# Altium PCB Copy of TQ210_BOARD_V4-20121031.PcbDoc (part 6 of 8)
Units mm, origin at the board's own origin, x right, y up, seen from the top; angles counter-clockwise.
Board outline 191.2 x 131.27 mm, 2 copper layers (TopLayer, BottomLayer); 362 components, 455 nets, 1594 pads, 630 vias.
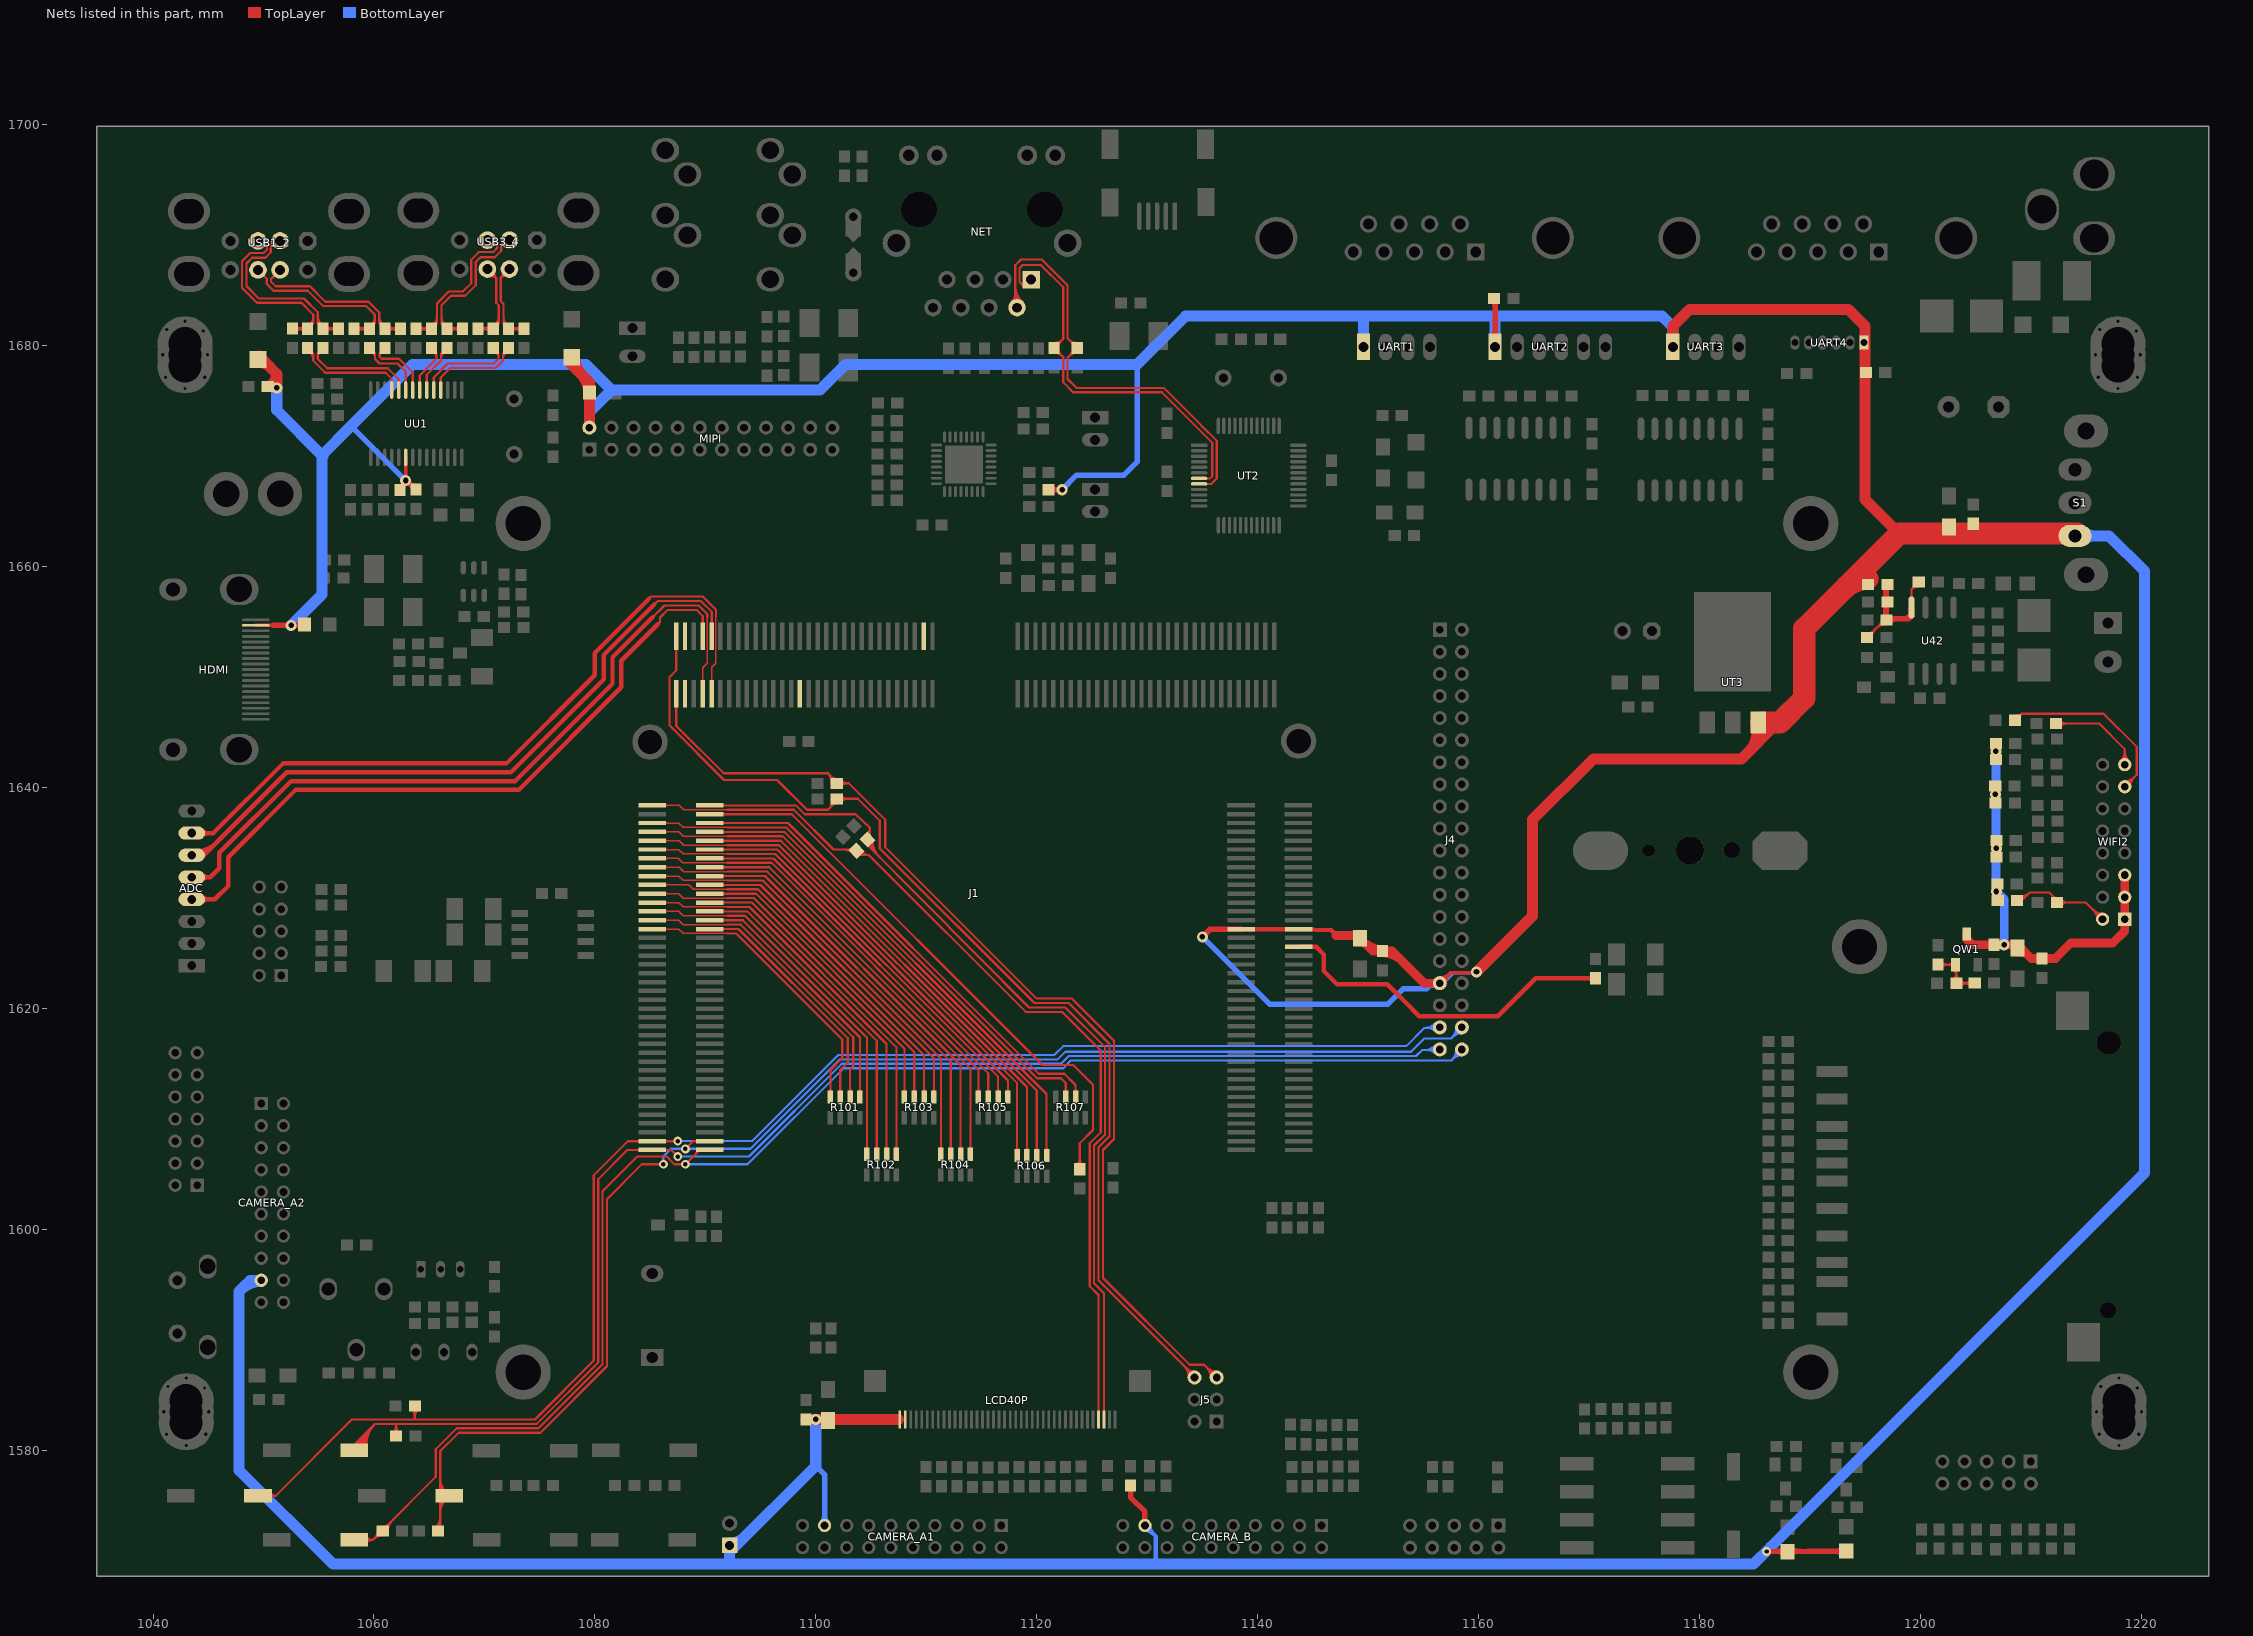
[diagram p6: the nets of this part, all layers, seen from the top]

## Via types
v1: diameter 1, hole 0.5, TopLayer to BottomLayer, 458 vias
v2: diameter 0.8, hole 0.4, TopLayer to BottomLayer, 172 vias

## Nets (pads, with @x,y where several pads share a name; then routed paths per layer and width w, separated by ;. In a path a pad name is that pad's centre, name@x,y a point inside that pad or via, vN(x,y) a via of type N, cw(c..) or ccw(c..) an arc to the next point about the centre after c; other vN are vias at no path point) (continued)
SD3_WPN: RW8.2 RW16.2 WIFI2.2 | length 17.4
  TopLayer w0.2: RW8.2@1208.765,1629.774 1209.174,1629.774 1209.9,1630.5 ; RW8.2@1208.815,1629.774 ccw(c1208.912,1630.38) 1209.346,1629.946 ; RW8.2@1208.846,1629.971 ccw(c1208.988,1630.858) 1209.623,1630.223 ; RW8.2@1208.878,1630.169 ccw(c1209.065,1631.335) 1209.9,1630.5 ; 1211.866,1630.339 cw(c1211.236,1629.71) RW16.2@1212.122,1629.624 ; RW16.2@1212.114,1630.091 ccw(c1212.321,1630.298) RW16.2@1212.321,1630.005 ; RW16.2@1212.371,1629.605 1214.995,1629.605 WIFI2.2@1216.512,1628.088 ; RW16.2@1212.6,1629.605 1211.705,1630.5 1209.9,1630.5 ; RW16.2@1212.704,1629.322 cw(c1213.387,1628.639) 1213.387,1629.605 cw(c1213.387,1630.571) RW16.2@1212.704,1629.888 ; WIFI2.2@1216.012,1628.088 ccw(c1214.805,1628.088) 1215.658,1628.942 ccw(c1216.512,1629.795) WIFI2.2@1216.512,1628.588 ; WIFI2.2@1216.212,1628.088 ccw(c1215.487,1628.088) 1215.999,1628.6 ccw(c1216.512,1629.112) WIFI2.2@1216.512,1628.388
SYS_OE: J1.84
TSXM0: ADC.6 J1.89 | length 63.1
  TopLayer w0.2: 1085.4,1656.6 1085.7,1656.9 1089.595,1656.9 1090.575,1655.92 J1.89@1090.575,1653.687
  TopLayer w0.4: ADC.6@1043.502,1633.888 1044.588,1633.888 1052.1,1641.4 1072.4,1641.4 1080.804,1649.804 1080.804,1652.004 1085.4,1656.6 ; ADC.6@1044.102,1633.888 ccw(c1044.102,1635.061) 1044.931,1634.231 ; ADC.6@1044.102,1634.288 ccw(c1044.102,1636.427) 1045.614,1634.914
TSXM1: CL1.1 J1.79 LCD40P.37 | length 89.3
  TopLayer w0.135: J1.79@1085.2,1638.4 1087.658,1638.4 1088.058,1638 1092,1638 ; J1.79@1086.344,1638.306 cw(c1086.57,1638.08) 1086.57,1638.4 cw(c1086.57,1638.72) J1.79@1086.344,1638.494
  TopLayer w0.2: 1092,1638 1098,1638 1101.603,1634.397 1103.603,1634.397 1104.1,1633.9 1104.8,1633.9 ; 1102.536,1634.397 cw(c1102.536,1633.21) CL1.1@1103.375,1634.049 ; 1102.848,1634.397 ccw(c1102.848,1635.142) CL1.1@1103.375,1634.615 ; CL1.1@1103.019,1634.397 cw(c1103.019,1633.693) CL1.1@1103.516,1634.191 ; CL1.1@1103.728,1634.261 ccw(c1104.237,1634.439) 1104.237,1633.9 ; CL1.1@1103.917,1634.327 ccw(c1104.518,1634.537) 1104.518,1633.9 ; CL1.1@1103.931,1633.917 cw(c1104.004,1633.794) 1104.105,1633.895 cw(c1104.21,1634) CL1.1@1104.08,1634.071 ; CL1.1@1104.106,1634.393 ccw(c1104.8,1634.635) 1104.8,1633.9 ; LCD40P.37@1125.6,1582.8 1125.6,1594.064 1124.8,1594.864 1124.8,1607.8 1125.8,1608.8 1125.8,1616.2 1122.3,1619.7 1119,1619.7 1104.8,1633.9
TSXP0: ADC.7 J1.90 | length 67.3
  TopLayer w0.135: J1.90@1090.565,1648.497 1090.565,1650.889 1090.965,1651.289 1090.965,1655.486
  TopLayer w0.2: 1084.9,1657.1 1085.1,1657.3 1089.795,1657.3 1090.955,1656.139 1090.955,1655.496
  TopLayer w0.4: ADC.7@1043.502,1635.888 1045.456,1635.888 1051.769,1642.2 1072,1642.2 1079.986,1650.186 1079.986,1652.186 1084.9,1657.1 ; ADC.7@1044.385,1635.605 cw(c1045.067,1634.922) 1045.067,1635.888 cw(c1045.067,1636.853) ADC.7@1044.385,1636.171
TSXP1: CL2.1 J1.80 LCD40P.38 | length 86.4
  TopLayer w0.2: J1.80@1090.409,1638.385 1090.424,1638.4 1098.2,1638.4 1099,1637.6 1103.6,1637.6 1104.9,1636.4 ; CL2.1@1104.47,1635.686 ccw(c1104.091,1636.4) 1104.9,1636.4 ; CL2.1@1104.564,1635.509 ccw(c1104.268,1636.068) 1104.9,1636.068 ; CL2.1@1104.658,1634.868 cw(c1104.606,1634.578) 1104.9,1634.578 ; CL2.1@1104.728,1635.261 ccw(c1105.903,1635.257) 1105.069,1634.429 ; 1104.9,1634.711 cw(c1105.279,1634.711) CL2.1@1105.011,1634.979 ; CL2.1@1104.928,1635.261 ccw(c1106.586,1635.255) 1105.41,1634.087 ; CL2.1@1105.128,1635.26 ccw(c1107.269,1635.253) 1105.75,1633.744 ; LCD40P.38@1126.1,1583 1126.1,1594.232 1125.2,1595.132 1125.2,1607.6 1126.2,1608.6 1126.2,1616.5 1122.6,1620.1 1119.3,1620.1 1104.9,1634.6 1104.9,1636.4
TSYM0: ADC.4 J1.87 | length 63.9
  TopLayer w0.2: 1085.7,1654.8 1085.9,1655 1085.9,1655.4 1086.6,1656.1 1089.195,1656.1 1089.775,1655.52 J1.87@1089.775,1653.687
  TopLayer w0.4: ADC.4@1043.502,1629.888 1045.588,1629.888 1046.8,1631.1 1046.8,1633.7 1052.9,1639.8 1073.1,1639.8 1082.4,1649.1 1082.4,1651.5 1085.7,1654.8 ; ADC.4@1044.385,1629.605 cw(c1045.067,1628.922) 1045.067,1629.888 cw(c1045.067,1630.853) ADC.4@1044.385,1630.171
TSYM1: CL3.1 J1.81 J5.6 | length 107.3
  TopLayer w0.2: J1.81@1087.294,1652.576 cw(c1087.098,1652.38) 1087.375,1652.38 ; 1087.375,1652.431 cw(c1087.581,1652.431) J1.81@1087.435,1652.576 ; J1.81@1087.375,1653.687 1087.375,1650.625 1086.75,1650 1086.75,1645.65 1091.7,1640.7 1096.5,1640.7 1099.2,1638 1101.1,1638 1102.1,1639 1103.8,1639 1105.8,1637 1105.8,1634.5 1119.8,1620.5 1122.9,1620.5 1126.6,1616.8 1126.6,1608.434 1125.6,1607.434 1125.6,1595.4 1134.3,1586.7 J5.6@1134.3,1586.6 ; 1101.223,1638.123 ccw(c1100.615,1638.731) CL3.1@1101.456,1638.91 ; 1101.483,1638.383 ccw(c1101.044,1638.822) CL3.1@1101.652,1638.951 ; 1101.583,1638.483 cw(c1101.847,1638.219) CL3.1@1101.847,1638.593 ; CL3.1@1102.089,1638.851 cw(c1102.448,1638.492) 1102.448,1639 ; CL3.1@1102.23,1638.71 cw(c1102.931,1638.009) 1102.931,1639 ; CL3.1@1102.23,1639.275 ccw(c1102.895,1639.94) 1102.895,1639 ; 1133.316,1587.684 cw(c1132.232,1586.6) 1133.765,1586.6 ccw(c1132.232,1586.6) 1133.316,1587.684 ; 1133.557,1587.443 ccw(c1134.3,1588.185) 1134.3,1587.135 cw(c1134.3,1588.185) 1133.557,1587.443 ; 1133.657,1587.343 cw(c1132.915,1586.6) 1133.965,1586.6 ccw(c1132.915,1586.6) 1133.657,1587.343 ; 1133.899,1587.101 ccw(c1134.3,1587.502) 1134.3,1586.935 cw(c1134.3,1587.502) 1133.899,1587.101
TSYP0: ADC.5 J1.88 | length 68.8
  TopLayer w0.135: J1.88@1089.671,1649.641 ccw(c1089.445,1649.867) 1089.765,1649.867 ccw(c1090.084,1649.867) J1.88@1089.858,1649.641 ; J1.88@1089.765,1648.497 1089.765,1650.876 1090.164,1651.276 1090.164,1655.391
  TopLayer w0.2: 1085.253,1655.453 1086.3,1656.5 1089.395,1656.5 1090.172,1655.722 1090.172,1655.399
  TopLayer w0.4: ADC.5@1043.502,1631.888 1045.188,1631.888 1046,1632.7 1046,1634.1 1052.5,1640.6 1072.8,1640.6 1081.6,1649.4 1081.6,1651.8 1085.253,1655.453 ; ADC.5@1044.385,1631.605 cw(c1045.067,1630.922) 1045.067,1631.888 cw(c1045.067,1632.853) ADC.5@1044.385,1632.171
TSYP1: CL4.1 J1.82 J5.5 | length 102.8
  TopLayer w0.2: J1.82@1087.294,1647.376 cw(c1087.098,1647.181) 1087.375,1647.181 ; 1087.375,1647.231 cw(c1087.581,1647.231) J1.82@1087.435,1647.376 ; J1.82@1087.375,1648.487 1087.375,1645.591 1091.666,1641.3 1101.1,1641.3 1102,1640.4 1103,1640.4 1106.3,1637.1 1106.3,1634.6 1120,1620.9 1123.2,1620.9 1127,1617.1 1127,1608.2 1126,1607.2 1126,1595.6 1133.852,1587.748 1135.152,1587.748 J5.5@1136.3,1586.6 ; 1101.051,1641.349 cw(c1100.095,1640.393) CL4.1@1101.447,1640.393 ; 1101.393,1641.007 cw(c1100.778,1640.393) CL4.1@1101.647,1640.393 ; 1101.438,1640.962 ccw(c1101.847,1641.372) CL4.1@1101.847,1640.793 ; CL4.1@1102.089,1640.251 cw(c1102.448,1639.892) 1102.448,1640.4 ; CL4.1@1102.23,1640.11 cw(c1102.931,1639.409) 1102.931,1640.4 ; CL4.1@1102.23,1640.675 ccw(c1102.895,1641.34) 1102.895,1640.4 ; 1135.387,1587.513 cw(c1134.473,1586.6) 1135.765,1586.6 ccw(c1134.473,1586.6) 1135.387,1587.513 ; 1135.387,1587.513 ccw(c1136.3,1588.427) 1136.3,1587.135 cw(c1136.3,1588.427) 1135.387,1587.513 ; 1135.728,1587.172 cw(c1135.156,1586.6) 1135.965,1586.6 ccw(c1135.156,1586.6) 1135.728,1587.172 ; 1135.728,1587.172 ccw(c1136.3,1587.744) 1136.3,1586.935 cw(c1136.3,1587.744) 1135.728,1587.172
TX+: NET.1 R206.1 UT2.7 | length 40.3
  TopLayer w0.2: NET.1@1119.073,1685.468 1118.768,1685.468 1118.457,1685.779 1118.457,1687.062 1118.718,1687.322 1120.378,1687.322 1122.4,1685.3 1122.4,1680.638 R206.1@1121.577,1679.815 1122.4,1678.992 1122.4,1676.7 1123.3,1675.8 1131.334,1675.8 1135.9,1671.234 1135.9,1668.2 1135.704,1668.004 UT2.7@1134.703,1668.004 ; R206.1@1121.577,1679.365 cw(c1121.577,1678.279) 1122.345,1679.047 ; R206.1@1121.577,1679.565 cw(c1121.577,1678.961) R206.1@1122.004,1679.388 ; R206.1@1121.577,1680.065 ccw(c1121.577,1680.669) R206.1@1122.004,1680.242 ; R206.1@1121.577,1680.265 ccw(c1121.577,1681.351) 1122.345,1680.583 ; R206.1@1121.977,1679.765 ccw(c1122.822,1679.765) 1122.225,1679.168 ; R206.1@1121.977,1679.865 cw(c1122.822,1679.865) 1122.225,1680.462
TX-: NET.2 R207.1 UT2.8 | length 51
  TopLayer w0.2: NET.2@1117.744,1683.946 ccw(c1116.988,1684.702) 1118.057,1684.702 ; 1118.057,1684.571 ccw(c1119.341,1684.571) NET.2@1118.433,1683.663 ; 1118.057,1685.054 ccw(c1119.824,1685.054) NET.2@1118.575,1683.805 ; 1118.057,1685.537 ccw(c1120.307,1685.537) NET.2@1118.716,1683.946 ; NET.2@1118.23,1683.46 1118.057,1683.633 1118.057,1687.297 1118.591,1687.83 1120.47,1687.83 1122.8,1685.5 1122.8,1680.692 R207.1@1123.677,1679.815 1122.8,1678.938 1122.8,1677 1123.6,1676.2 1131.5,1676.2 1136.3,1671.4 ; 1122.909,1679.047 cw(c1123.677,1678.279) R207.1@1123.677,1679.365 ; 1122.909,1680.583 ccw(c1123.677,1681.351) R207.1@1123.677,1680.265 ; 1123.03,1679.168 ccw(c1122.432,1679.765) R207.1@1123.277,1679.765 ; 1123.03,1680.462 cw(c1122.432,1679.865) R207.1@1123.277,1679.865 ; R207.1@1123.25,1679.388 cw(c1123.677,1678.961) R207.1@1123.677,1679.565 ; R207.1@1123.25,1680.242 ccw(c1123.677,1680.669) R207.1@1123.677,1680.065 ; UT2.8@1134.703,1667.504 1135.804,1667.504 1136.3,1668 1136.3,1671.4 ; 1134.9,1672.8 1136.3,1671.4
USB1-DM: RU1.1 UU1.10 | length 12
  TopLayer w0.2: 1054.9,1678.902 1054.913,1678.915 ; 1054.913,1678.937 cw(c1055.538,1678.937) RU1.1@1055.433,1679.553 ; 1054.913,1679.173 cw(c1055.498,1679.173) RU1.1@1055.4,1679.75 ; RU1.1@1055.4,1679.8 1054.913,1679.313 1054.913,1678.82 1055.764,1677.968 1061.244,1677.968 1062.235,1676.977 UU1.10@1062.235,1676
USB1-DP: RU2.1 UU1.11 | length 12
  TopLayer w0.2: RU2.1@1053.945,1679.558 cw(c1053.735,1678.822) 1054.5,1678.822 ; RU2.1@1054,1679.75 cw(c1053.811,1679.087) 1054.5,1679.087 ; RU2.1@1054,1679.8 1054.5,1679.3 1054.5,1678.667 1055.599,1677.568 1061.06,1677.568 1061.6,1677.028 UU1.11@1061.6,1676
USB1_D+: RU2.2 RU4.2 USB1_2.3 | length 23
  TopLayer w0.2: USB1_2.3@1049.5,1689.5 1049.906,1689.5 1050.305,1689.102 1050.305,1688.695 1050.025,1688.416 1048.806,1688.416 1048.044,1687.654 1048.044,1685.266 1049.41,1683.9 1053.433,1683.9 1054.506,1682.826 1054.506,1682.056 ; RU4.2@1052.62,1681.565 1052.635,1681.55 RU2.2@1054,1681.55 1054.506,1682.056 ; RU4.2@1052.761,1681.707 ccw(c1053.14,1682.085) 1053.14,1681.55 ; RU4.2@1052.903,1681.283 cw(c1053.548,1680.637) RU2.2@1053.548,1681.55 ; RU4.2@1052.903,1681.848 ccw(c1053.623,1682.568) RU2.2@1053.623,1681.55 ; RU2.2@1053.717,1681.267 ccw(c1053.034,1680.584) 1053.034,1681.55 ccw(c1053.034,1682.516) RU2.2@1053.717,1681.833 ; RU2.2@1053.941,1681.791 ccw(c1053.707,1682.556) 1054.506,1682.556 ; RU2.2@1054,1681.6 ccw(c1053.79,1682.285) 1054.506,1682.285 ; RU2.2@1054.138,1681.975 ccw(c1054.259,1682.304) 1054.506,1682.056 ; RU2.2@1054.392,1681.679 cw(c1054.802,1681.761) 1054.506,1682.056
USB1_D-: RU1.2 RU3.2 USB1_2.2 | length 22
  TopLayer w0.2: USB1_2.2@1051.5,1689.5 1051.033,1689.5 1050.66,1689.127 1050.66,1688.467 1050.178,1687.984 1048.984,1687.984 1048.45,1687.451 1048.45,1685.425 1049.576,1684.3 1053.668,1684.3 1054.913,1683.055 1054.913,1682.037 RU1.2@1055.4,1681.55 RU3.2@1056.8,1681.55 ; 1054.913,1682.399 ccw(c1055.811,1682.399) RU1.2@1055.4,1681.6 ; 1054.913,1682.727 ccw(c1055.98,1682.727) RU1.2@1055.492,1681.778 ; RU1.2@1055.683,1681.267 cw(c1056.366,1680.584) 1056.366,1681.55 cw(c1056.366,1682.516) RU1.2@1055.683,1681.833 ; RU3.2@1056.517,1681.267 ccw(c1055.834,1680.584) 1055.834,1681.55 ccw(c1055.834,1682.516) RU3.2@1056.517,1681.833
USB2-DM: RU5.1 UU1.8 | length 6.1
  TopLayer w0.2: RU5.1@1061,1679.8 1060.526,1679.326 1060.526,1679.016 1060.704,1678.838 1062.27,1678.838 1063.505,1677.603 UU1.8@1063.505,1676
USB2-DP: RU6.1 UU1.9 | length 7.8
  TopLayer w0.2: RU6.1@1059.566,1679.553 cw(c1059.46,1678.927) 1060.094,1678.927 ; RU6.1@1059.6,1679.75 cw(c1059.5,1679.164) 1060.094,1679.164 ; RU6.1@1059.6,1679.8 1060.094,1679.306 1060.094,1678.813 1060.501,1678.407 1062.136,1678.407 1062.87,1677.673 UU1.9@1062.87,1676
USB2_D+: RU6.2 RU8.2 USB1_2.7 | length 20.3
  TopLayer w0.2: USB1_2.7@1049.5,1686.88 1050.3,1686.08 1050.3,1685.6 1050.9,1685 1054,1685 1055.4,1683.6 1059.321,1683.6 1060.069,1682.852 1060.069,1682.019 RU6.2@1059.6,1681.55 RU8.2@1058.2,1681.55 ; RU8.2@1058.483,1681.267 cw(c1059.166,1680.584) 1059.166,1681.55 cw(c1059.166,1682.516) RU8.2@1058.483,1681.833 ; RU6.2@1059.317,1681.267 ccw(c1058.634,1680.584) 1058.634,1681.55 ccw(c1058.634,1682.516) RU6.2@1059.317,1681.833 ; RU6.2@1059.53,1681.787 ccw(c1059.241,1682.564) 1060.069,1682.564 ; RU6.2@1059.6,1681.6 ccw(c1059.348,1682.275) 1060.069,1682.275
USB2_D-: RU5.2 RU7.2 USB1_2.6 | length 21.5
  TopLayer w0.2: USB1_2.6@1051.5,1686.88 1050.686,1686.066 1050.686,1685.814 1051.1,1685.4 1054.2,1685.4 1055.6,1684 1059.505,1684 1060.475,1683.029 1060.475,1682.075 RU5.2@1061,1681.55 RU7.2@1062.4,1681.55 ; 1060.475,1682.411 ccw(c1061.365,1682.411) RU5.2@1061,1681.6 ; 1060.475,1682.72 ccw(c1061.504,1682.72) RU5.2@1061.082,1681.782 ; RU5.2@1060.609,1681.683 ccw(c1060.218,1681.767) 1060.5,1682.05 ccw(c1060.737,1682.286) RU5.2@1060.857,1681.974 ; RU5.2@1061.283,1681.267 cw(c1061.966,1680.584) 1061.966,1681.55 cw(c1061.966,1682.516) RU5.2@1061.283,1681.833 ; RU7.2@1062.117,1681.267 ccw(c1061.434,1680.584) 1061.434,1681.55 ccw(c1061.434,1682.516) RU7.2@1062.117,1681.833
USB3-DM: RU9.1 UU1.6 | length 6.5
  TopLayer w0.2: UU1.6@1064.775,1676 1064.775,1677.381 1066.063,1678.669 1066.063,1679.263 RU9.1@1066.6,1679.8 ; 1066.063,1678.801 cw(c1066.843,1678.801) RU9.1@1066.65,1679.556 ; 1066.063,1679.059 cw(c1066.777,1679.059) RU9.1@1066.6,1679.75
USB3-DP: RU10.1 UU1.7 | length 6.2
  TopLayer w0.2: UU1.7@1064.14,1676 1064.14,1677.311 1065.657,1678.828 1065.657,1679.343 RU10.1@1065.2,1679.8 ; RU10.1@1065.164,1679.553 cw(c1065.055,1678.961) 1065.657,1678.961 ; RU10.1@1065.2,1679.75 cw(c1065.099,1679.201) 1065.657,1679.201
USB3_D+: RU10.2 RU12.2 USB3_4.3 | length 21.3
  TopLayer w0.2: RU12.2@1063.8,1681.55 RU10.2@1065.2,1681.55 1065.708,1682.058 ; RU12.2@1064.083,1681.267 cw(c1064.766,1680.584) 1064.766,1681.55 cw(c1064.766,1682.516) RU12.2@1064.083,1681.833 ; RU10.2@1064.917,1681.267 ccw(c1064.234,1680.584) 1064.234,1681.55 ccw(c1064.234,1682.516) RU10.2@1064.917,1681.833 ; RU10.2@1065.2,1681.6 ccw(c1063.974,1682.826) 1065.708,1682.826 ; RU10.2@1065.337,1681.976 ccw(c1065.458,1682.307) 1065.708,1682.058 ; RU10.2@1065.341,1681.459 ccw(c1064.457,1682.343) 1065.708,1682.343 ; RU10.2@1065.592,1681.678 cw(c1066.006,1681.76) 1065.708,1682.058 ; USB3_4.3@1070.266,1689.576 1070.769,1689.576 1071.169,1689.176 1071.169,1688.871 1070.788,1688.49 1069.492,1688.49 1068.807,1687.805 1068.807,1685.671 1068.07,1684.934 1066.8,1684.934 1065.708,1683.842 1065.708,1682.058 ; USB3_4.3@1070.435,1689.328 cw(c1070.72,1688.909) 1071.078,1689.267 ; USB3_4.3@1070.966,1689.576 ccw(c1071.443,1689.576) 1071.106,1689.239
USB3_D-: RU9.2 RU11.2 USB3_4.2 | length 19.1
  TopLayer w0.2: 1066.114,1682.272 ccw(c1067.247,1682.272) RU9.2@1066.461,1681.456 ; 1066.114,1682.742 ccw(c1067.7,1682.742) RU9.2@1066.6,1681.6 ; RU9.2@1066.883,1681.267 cw(c1067.566,1680.584) 1067.566,1681.55 cw(c1067.566,1682.516) RU9.2@1066.883,1681.833 ; RU11.2@1067.717,1681.267 ccw(c1067.034,1680.584) 1067.034,1681.55 ccw(c1067.034,1682.516) RU11.2@1067.717,1681.833 ; RU11.2@1068,1681.55 RU9.2@1066.6,1681.55 1066.114,1682.036 1066.114,1683.683 1066.966,1684.534 1068.254,1684.534 1069.213,1685.493 1069.213,1687.601 1069.645,1688.033 1070.94,1688.033 1071.524,1688.617 1071.524,1689.176 1071.924,1689.576 USB3_4.2@1072.266,1689.576
USB4-DM: RU13.1 UU1.4 | length 10.7
  TopLayer w0.2: UU1.4@1066.045,1676 1066.045,1677.144 1066.902,1678 1071.016,1678 1071.677,1678.661 1071.677,1679.277 RU13.1@1072.2,1679.8 ; 1071.677,1678.803 cw(c1072.458,1678.803) RU13.1@1072.253,1679.557 ; 1071.677,1679.065 cw(c1072.387,1679.065) RU13.1@1072.2,1679.75
USB4-DP: RU14.1 UU1.5 | length 10.5
  TopLayer w0.2: UU1.5@1065.41,1676 1065.41,1677.144 1066.667,1678.4 1070.832,1678.4 1071.27,1678.838 1071.27,1679.33 RU14.1@1070.8,1679.8 ; RU14.1@1070.767,1679.553 cw(c1070.67,1678.96) 1071.27,1678.96 ; RU14.1@1070.8,1679.75 cw(c1070.709,1679.196) 1071.27,1679.196
USB4_D+: RU14.2 RU16.2 USB3_4.7 | length 14.8
  TopLayer w0.2: RU16.2@1069.4,1681.55 RU14.2@1070.8,1681.55 1071.296,1682.046 1071.296,1683.664 1071.067,1683.893 1071.067,1686.155 ; RU16.2@1069.683,1681.267 cw(c1070.366,1680.584) 1070.366,1681.55 cw(c1070.366,1682.516) RU16.2@1069.683,1681.833 ; USB3_4.7@1070.266,1686.956 1071.067,1686.155 ; USB3_4.7@1070.425,1686.482 cw(c1070.552,1686.098) 1070.838,1686.384 cw(c1071.124,1686.67) USB3_4.7@1070.741,1686.798 ; USB3_4.7@1070.488,1686.292 cw(c1070.667,1685.755) 1071.067,1686.155 ; RU14.2@1070.517,1681.267 ccw(c1069.834,1680.584) 1069.834,1681.55 ccw(c1069.834,1682.516) RU14.2@1070.517,1681.833 ; RU14.2@1070.8,1681.6 ccw(c1069.731,1682.743) 1071.296,1682.743 ; USB3_4.7@1070.93,1686.735 ccw(c1071.467,1686.556) 1071.067,1686.155 ; RU14.2@1070.937,1681.454 ccw(c1070.163,1682.282) 1071.296,1682.282
USB4_D-: RU13.2 RU15.2 USB3_4.6 | length 14.7
  TopLayer w0.2: USB3_4.6@1071.604,1686.729 cw(c1071.086,1686.551) 1071.474,1686.163 ; 1071.728,1682.258 ccw(c1072.858,1682.258) RU13.2@1072.059,1681.459 ; 1071.728,1682.74 ccw(c1073.34,1682.74) RU13.2@1072.2,1681.6 ; USB3_4.6@1071.794,1686.794 cw(c1071.423,1686.667) 1071.7,1686.39 cw(c1071.977,1686.113) USB3_4.6@1072.104,1686.483 ; USB3_4.6@1072.039,1686.294 ccw(c1071.861,1685.776) 1071.474,1686.163 ; USB3_4.6@1072.266,1686.956 1071.474,1686.163 ; RU13.2@1072.483,1681.267 cw(c1073.166,1680.584) 1073.166,1681.55 cw(c1073.166,1682.516) RU13.2@1072.483,1681.833 ; RU15.2@1073.317,1681.267 ccw(c1072.634,1680.584) 1072.634,1681.55 ccw(c1072.634,1682.516) RU15.2@1073.317,1681.833 ; RU15.2@1073.6,1681.55 RU13.2@1072.2,1681.55 1071.728,1682.022 1071.728,1683.798 1071.474,1684.052 1071.474,1686.163
VCC_WIFI: CW2.2 CW5.1 QW1.3 RW1.1 RW2.1 RW3.1 RW4.1 RW5.1 RW6.1 RW7.1 RW8.1 RW21.1 WIFI2.1 WIFI2.3 WIFI2.5 | length 63.5
  TopLayer w0.5: QW1.3@1204.356,1626.536 ccw(c1205.178,1626.486) 1204.596,1625.904 ; RW21.1@1206.518,1625.602 ccw(c1206.091,1625.175) 1206.091,1625.779 ccw(c1206.091,1626.382) RW21.1@1206.518,1625.955 ; RW7.1@1206.595,1638.782 ccw(c1206.115,1639.261) v1@1206.793,1639.261 ; RW4.1@1206.616,1639.992 cw(c1206.19,1639.565) 1206.793,1639.565 cw(c1207.397,1639.565) RW4.1@1206.97,1639.992 ; RW5.1@1206.666,1642.746 ccw(c1206.223,1643.189) v1@1206.85,1643.189 ; RW6.1@1206.673,1643.823 cw(c1206.246,1643.396) 1206.85,1643.396 cw(c1207.454,1643.396) RW6.1@1207.027,1643.823 ; RW2.1@1206.716,1633.896 ccw(c1206.29,1634.323) 1206.893,1634.323 ccw(c1207.497,1634.323) RW2.1@1207.07,1633.896 ; RW3.1@1206.716,1635.042 cw(c1206.29,1634.615) 1206.893,1634.615 cw(c1207.497,1634.615) RW3.1@1207.07,1635.042 ; v1@1206.793,1639.156 ccw(c1207.323,1639.156) RW7.1@1206.948,1638.782 ; v1@1206.85,1643.156 ccw(c1207.43,1643.156) RW5.1@1207.02,1642.746 ; RW21.1@1206.872,1625.602 cw(c1207.299,1625.175) 1207.299,1625.779 cw(c1207.299,1626.382) RW21.1@1206.872,1625.955 ; v1@1207.483,1625.779 cw(c1207.483,1624.315) CW5.1@1208.518,1625.35 ; CW5.1@1208.79,1624.983 cw(c1208.79,1622.986) 1210.202,1624.398 ; CW2.2@1210.828,1624.358 ccw(c1210.401,1623.931) 1210.401,1624.535 ccw(c1210.401,1625.138) CW2.2@1210.828,1624.711 ; CW2.2@1211.182,1624.358 cw(c1211.609,1623.931) 1211.609,1624.535 cw(c1211.609,1625.138) CW2.2@1211.182,1624.711 ; WIFI2.1@1218.264,1627.841 cw(c1217.667,1627.243) 1218.512,1627.243 cw(c1219.357,1627.243) WIFI2.1@1218.759,1627.841 ; WIFI2.1@1218.264,1628.335 ccw(c1217.667,1628.933) 1218.512,1628.933 ccw(c1219.357,1628.933) WIFI2.1@1218.759,1628.335 ; WIFI2.3@1218.264,1629.841 cw(c1217.667,1629.243) 1218.512,1629.243 cw(c1219.357,1629.243) WIFI2.3@1218.759,1629.841 ; WIFI2.3@1218.264,1630.335 ccw(c1217.667,1630.933) 1218.512,1630.933 ccw(c1219.357,1630.933) WIFI2.3@1218.759,1630.335 ; WIFI2.5@1218.264,1631.841 cw(c1217.667,1631.243) 1218.512,1631.243 cw(c1219.357,1631.243) WIFI2.5@1218.759,1631.841
  TopLayer w0.8: QW1.3@1204.206,1626.745 1204.206,1626.294 1204.721,1625.779 1208.821,1625.779 1210.065,1624.535 1212.235,1624.535 1213.635,1625.935 1217.435,1625.935 1218.512,1627.012 WIFI2.5@1218.512,1632.088 ; RW4.1@1206.793,1640.169 1206.793,1638.633 RW7.1@1206.821,1638.605 ; RW5.1@1206.843,1642.569 1206.85,1642.576 RW6.1@1206.85,1644 ; RW2.1@1206.893,1633.719 RW3.1@1206.893,1635.219
  BottomLayer w0.8: v1@1206.85,1630.6 v1@1206.85,1643.309 ; v1(1206.892,1630.6) 1207.6,1629.892 v1(1207.6,1625.779)
  other v1: 1206.893,1634.5 1206.793,1639.4 1206.85,1643.3
VCLK: J1.78 R108.2 | length 54.3
  TopLayer w0.2: J1.78@1090.398,1637.595 1097.838,1637.595 ; 1097.838,1637.585 1120.526,1614.897 1123.303,1614.897 1125.1,1613.1 1125.1,1609 1123.9,1607.8 R108.2@1123.9,1605.65 ; R108.2@1123.617,1605.783 ccw(c1122.934,1606.466) 1123.9,1606.466 ccw(c1124.866,1606.466) R108.2@1124.183,1605.783
VD0: J1.51 R101.4 | length 27.5
  TopLayer w0.135: J1.51@1085.2,1627.2 1087.6,1627.2 1088,1626.8 1092,1626.8
  TopLayer w0.2: 1092,1626.8 1092.8,1626.8 1102.39,1617.21 1102.39,1615.5 1101.333,1614.443 R101.4@1101.333,1612 ; R101.4@1101.227,1612.456 ccw(c1100.971,1612.712) 1101.333,1612.712 ccw(c1101.695,1612.712) R101.4@1101.439,1612.456
VD1: J1.52 R101.3 | length 22.7
  TopLayer w0.2: J1.52@1090.4,1627.2 1093,1627.2 1102.89,1617.31 1102.89,1615.1 1102.222,1614.432 R101.3@1102.222,1612 ; R101.3@1102.116,1612.456 ccw(c1101.86,1612.712) 1102.222,1612.712 ccw(c1102.584,1612.712) R101.3@1102.328,1612.456
VD2: J1.53 R101.2 | length 29.2
  TopLayer w0.135: J1.53@1085.2,1628 1085.7,1628 1087.6,1628 1088,1627.6 1092,1627.6 ; J1.53@1086.344,1627.906 cw(c1086.57,1627.68) 1086.57,1628 cw(c1086.57,1628.32) J1.53@1086.344,1628.094
  TopLayer w0.2: 1092,1627.6 1093.2,1627.6 1103.4,1617.4 1103.4,1614.8 1103.111,1614.511 R101.2@1103.111,1612 ; R101.2@1103.005,1612.456 ccw(c1102.749,1612.712) 1103.111,1612.712 ccw(c1103.473,1612.712) R101.2@1103.217,1612.456
VD3: J1.54 R101.1 | length 24
  TopLayer w0.2: J1.54@1090.4,1628 1093.39,1628 1104,1617.39 R101.1@1104,1612 ; R101.1@1103.894,1612.456 ccw(c1103.638,1612.712) 1104,1612.712 ccw(c1104.362,1612.712) R101.1@1104.106,1612.456
VD4: J1.55 R102.4 | length 35.8
  TopLayer w0.135: J1.55@1085.2,1628.8 1087.6,1628.8 1088,1628.4 1092,1628.4 ; J1.55@1086.344,1628.706 cw(c1086.57,1628.48) 1086.57,1628.8 cw(c1086.57,1629.12) J1.55@1086.344,1628.894
  TopLayer w0.2: 1092,1628.4 1093.6,1628.4 1104.633,1617.367 R102.4@1104.633,1606.8 ; R102.4@1104.527,1607.256 ccw(c1104.271,1607.512) 1104.633,1607.512 ccw(c1104.995,1607.512) R102.4@1104.739,1607.256
VD5: J1.56 R102.3 | length 30.8
  TopLayer w0.2: J1.56@1090.4,1628.8 1093.8,1628.8 1105.522,1617.078 R102.3@1105.522,1606.8 ; R102.3@1105.416,1607.256 ccw(c1105.16,1607.512) 1105.522,1607.512 ccw(c1105.884,1607.512) R102.3@1105.628,1607.256
VD6: J1.57 R102.2 | length 37.6
  TopLayer w0.135: J1.57@1085.2,1629.6 1087.6,1629.6 1088,1629.2 1092,1629.2 ; J1.57@1086.344,1629.506 cw(c1086.57,1629.28) 1086.57,1629.6 cw(c1086.57,1629.92) J1.57@1086.344,1629.694
  TopLayer w0.2: 1092,1629.2 1094,1629.2 1106.411,1616.789 R102.2@1106.411,1606.8 ; R102.2@1106.305,1607.256 ccw(c1106.049,1607.512) 1106.411,1607.512 ccw(c1106.773,1607.512) R102.2@1106.517,1607.256
VD7: J1.58 R102.1 | length 32.6
  TopLayer w0.2: J1.58@1090.4,1629.6 1094.2,1629.6 1107.3,1616.5 R102.1@1107.3,1606.8 ; R102.1@1107.194,1607.256 ccw(c1106.938,1607.512) 1107.3,1607.512 ccw(c1107.662,1607.512) R102.1@1107.406,1607.256
VD8: J1.59 R103.4 | length 34.1
  TopLayer w0.135: J1.59@1085.2,1630.4 1087.6,1630.4 1088,1630 1092,1630 ; J1.59@1086.344,1630.306 cw(c1086.57,1630.08) 1086.57,1630.4 cw(c1086.57,1630.72) J1.59@1086.344,1630.494
  TopLayer w0.2: 1092,1630 1094.4,1630 1108.033,1616.367 R103.4@1108.033,1612 ; R103.4@1107.927,1612.456 ccw(c1107.671,1612.712) 1108.033,1612.712 ccw(c1108.395,1612.712) R103.4@1108.139,1612.456
VD9: J1.60 R103.3 | length 29.1
  TopLayer w0.2: J1.60@1090.4,1630.4 1094.6,1630.4 1108.922,1616.078 R103.3@1108.922,1612 ; R103.3@1108.816,1612.456 ccw(c1108.56,1612.712) 1108.922,1612.712 ccw(c1109.284,1612.712) R103.3@1109.028,1612.456
VD10: J1.61 R103.2 | length 35.8
  TopLayer w0.135: J1.61@1085.2,1631.2 1088.511,1631.2 1088.911,1630.8 1092,1630.8 ; J1.61@1086.344,1631.106 cw(c1086.57,1630.88) 1086.57,1631.2 cw(c1086.57,1631.52) J1.61@1086.344,1631.294
  TopLayer w0.2: 1092,1630.8 1094.771,1630.8 1109.811,1615.76 R103.2@1109.811,1612 ; R103.2@1109.705,1612.456 ccw(c1109.449,1612.712) 1109.811,1612.712 ccw(c1110.173,1612.712) R103.2@1109.917,1612.456
VD11: J1.62 R103.1 | length 30.9
  TopLayer w0.2: J1.62@1090.398,1631.195 1095.005,1631.195 1110.7,1615.5 R103.1@1110.7,1612 ; R103.1@1110.594,1612.456 ccw(c1110.338,1612.712) 1110.7,1612.712 ccw(c1111.062,1612.712) R103.1@1110.806,1612.456
VD12: J1.63 R104.4 | length 42.7
  TopLayer w0.135: J1.63@1085.2,1632 1087.582,1632 1087.981,1631.601 1092,1631.601 ; J1.63@1086.344,1631.906 cw(c1086.57,1631.68) 1086.57,1632 cw(c1086.57,1632.32) J1.63@1086.344,1632.094
  TopLayer w0.2: 1092,1631.601 1095.199,1631.601 1111.333,1615.467 R104.4@1111.333,1606.8 ; R104.4@1111.227,1607.256 ccw(c1110.971,1607.512) 1111.333,1607.512 ccw(c1111.695,1607.512) R104.4@1111.439,1607.256
VD13: J1.64 R104.3 | length 37.7
  TopLayer w0.2: J1.64@1090.398,1631.995 1095.405,1631.995 1112.222,1615.178 R104.3@1112.222,1606.8 ; R104.3@1112.116,1607.256 ccw(c1111.86,1607.512) 1112.222,1607.512 ccw(c1112.584,1607.512) R104.3@1112.328,1607.256
VD14: J1.65 R104.2 | length 44.5
  TopLayer w0.135: J1.65@1085.2,1632.8 1087.657,1632.8 1088.058,1632.399 1091.999,1632.399 ; J1.65@1086.344,1632.706 cw(c1086.57,1632.48) 1086.57,1632.8 cw(c1086.57,1633.12) J1.65@1086.344,1632.894
  TopLayer w0.2: 1092,1632.4 1095.6,1632.4 1113.111,1614.889 R104.2@1113.111,1606.8 ; R104.2@1113.005,1607.256 ccw(c1112.749,1607.512) 1113.111,1607.512 ccw(c1113.473,1607.512) R104.2@1113.217,1607.256
VD15: J1.66 R104.1 | length 39.5
  TopLayer w0.2: J1.66@1090.398,1632.795 1090.6,1632.795 1090.605,1632.8 1095.8,1632.8 1114,1614.6 R104.1@1114,1606.8 ; R104.1@1113.894,1607.256 ccw(c1113.638,1607.512) 1114,1607.512 ccw(c1114.362,1607.512) R104.1@1114.106,1607.256
VD16: J1.67 R105.4 | length 41
  TopLayer w0.135: J1.67@1085.2,1633.6 1087.568,1633.6 1087.967,1633.201 1091.999,1633.201 ; J1.67@1086.344,1633.506 cw(c1086.57,1633.28) 1086.57,1633.6 cw(c1086.57,1633.92) J1.67@1086.344,1633.694
  TopLayer w0.2: 1092,1633.2 1095.971,1633.2 ; 1095.971,1633.195 1096.005,1633.195 1114.733,1614.467 R105.4@1114.733,1612 ; R105.4@1114.627,1612.456 ccw(c1114.371,1612.712) 1114.733,1612.712 ccw(c1115.095,1612.712) R105.4@1114.839,1612.456
VD17: J1.68 R105.3 | length 36
  TopLayer w0.2: J1.68@1090.398,1633.595 1096.171,1633.595 1115.622,1614.144 R105.3@1115.622,1612 ; R105.3@1115.516,1612.456 ccw(c1115.26,1612.712) 1115.622,1612.712 ccw(c1115.984,1612.712) R105.3@1115.728,1612.456
VD18: J1.69 R105.2 | length 42.7
  TopLayer w0.135: J1.69@1085.2,1634.4 1087.6,1634.4 1088,1634 1092,1634 ; J1.69@1086.344,1634.306 cw(c1086.57,1634.08) 1086.57,1634.4 cw(c1086.57,1634.72) J1.69@1086.344,1634.494
  TopLayer w0.2: 1092.005,1633.995 1096.336,1633.995 1116.511,1613.82 R105.2@1116.511,1612 ; R105.2@1116.405,1612.456 ccw(c1116.149,1612.712) 1116.511,1612.712 ccw(c1116.873,1612.712) R105.2@1116.617,1612.456
VD19: J1.70 R105.1 | length 37.7
  TopLayer w0.2: J1.70@1090.398,1634.395 1096.502,1634.395 1117.4,1613.497 R105.1@1117.4,1612 ; R105.1@1117.294,1612.456 ccw(c1117.038,1612.712) 1117.4,1612.712 ccw(c1117.762,1612.712) R105.1@1117.506,1612.456
VD20: J1.71 R106.4 | length 49.7
  TopLayer w0.135: J1.71@1085.2,1635.2 1087.636,1635.2 1088.037,1634.799 1092.001,1634.799 ; J1.71@1086.344,1635.106 cw(c1086.57,1634.88) 1086.57,1635.2 cw(c1086.57,1635.52) J1.71@1086.344,1635.294
  TopLayer w0.2: 1092.005,1634.795 1096.668,1634.795 1118.233,1613.23 R106.4@1118.233,1606.7 ; R106.4@1118.127,1607.156 ccw(c1117.871,1607.412) 1118.233,1607.412 ccw(c1118.595,1607.412) R106.4@1118.339,1607.156
VD21: J1.72 R106.3 | length 44.7
  TopLayer w0.2: J1.72@1090.398,1635.195 1096.833,1635.195 1119.122,1612.906 R106.3@1119.122,1606.7 ; R106.3@1119.016,1607.156 ccw(c1118.76,1607.412) 1119.122,1607.412 ccw(c1119.484,1607.412) R106.3@1119.228,1607.156
VD22: J1.73 R106.2 | length 51.5
  TopLayer w0.135: J1.73@1085.2,1636 1087.6,1636 1087.999,1635.601 1091.999,1635.601 ; J1.73@1086.344,1635.906 cw(c1086.57,1635.68) 1086.57,1636 cw(c1086.57,1636.32) J1.73@1086.344,1636.094
  TopLayer w0.2: 1092.005,1635.595 1096.999,1635.595 1120.011,1612.583 R106.2@1120.011,1606.7 ; R106.2@1119.905,1607.156 ccw(c1119.649,1607.412) 1120.011,1607.412 ccw(c1120.373,1607.412) R106.2@1120.117,1607.156
VD23: J1.74 R106.1 | length 46.5
  TopLayer w0.2: J1.74@1090.398,1635.995 1090.403,1636 1097.16,1636 1120.9,1612.26 R106.1@1120.9,1606.7 ; R106.1@1120.794,1607.156 ccw(c1120.538,1607.412) 1120.9,1607.412 ccw(c1121.262,1607.412) R106.1@1121.006,1607.156
VDD: C423.2 L421.2 L422.2 R421.1 R425.2 U42.8 | length 23
  TopLayer w0.2: R421.1@1195.18,1653.598 1196.87,1655.287 C423.2@1196.96,1655.287 ; R421.1@1195.23,1653.998 ccw(c1195.23,1654.843) 1195.828,1654.245 ; R421.1@1195.43,1653.598 cw(c1196.034,1653.598) R421.1@1195.607,1654.024 ; R421.1@1195.63,1653.598 cw(c1196.717,1653.598) 1195.948,1654.366 ; 1195.988,1654.406 cw(c1196.91,1653.484) C423.2@1196.91,1654.787 ; 1196.326,1654.743 ccw(c1195.882,1655.187) C423.2@1196.51,1655.187 ; 1196.33,1654.747 cw(c1196.91,1654.167) C423.2@1196.91,1654.987 ; U42.8@1199.085,1657.16 ccw(c1198.786,1657.458) 1199.209,1657.458 ccw(c1199.631,1657.458) U42.8@1199.332,1657.16 ; U42.8@1199.209,1656 1199.209,1657.941 R425.2@1199.87,1658.602 ; R425.2@1199.424,1658.543 cw(c1198.756,1658.444) 1199.234,1657.966 cw(c1199.804,1657.396) R425.2@1199.815,1658.202
  TopLayer w0.5: C423.2@1196.733,1655.364 ccw(c1196.33,1655.767) 1196.9,1655.767 ; 1196.9,1655.815 ccw(c1197.537,1655.815) C423.2@1197.087,1655.364 ; 1196.9,1657.6 cw(c1197.777,1657.6) L422.2@1197.157,1658.221 ; L422.2@1196.9,1658.4 1196.9,1655.347 1196.96,1655.287 1198.787,1655.287 ; C423.2@1197.187,1655.011 cw(c1197.855,1654.342) 1197.855,1655.287 ; 1198.428,1655.287 ccw(c1198.428,1656.367) U42.8@1199.191,1655.603 ; 1198.956,1655.456 cw(c1199.209,1655.204) U42.8@1199.209,1655.561 ; U42.8@1199.184,1655.592 cw(c1198.787,1655.698) 1198.787,1655.287 ; U42.8@1199.209,1656.311 1199.209,1655.709 1198.787,1655.287 ; 1196.9,1657.595 ccw(c1197.777,1657.595) 1197.157,1656.974 cw(c1197.777,1657.595) 1196.9,1657.595
VDD5V: C21.1 C22.1 C23.1 C105.1 C106.1 C107.1 CAMERA_A1.17 CAMERA_A2.17 CAMERA_B.17 CM2.1 CM4.1 CMB2.1 CU4.1 CU6.1 CU7.1 CV1.1 FUSE2.2 FUSE3.2 HDMI.18 J1.229 J1.230 J3.1 J4.33 L422.1 L506.2 LCD40P.1 LCD40P.2 LED1.1 LED2.1 MIPI.2 RU20.1 S1.2 UART1.1 UART2.1 UART3.1 UART4.1 UT3.3 UU1.20 | length 753.1
  TopLayer w0.2: RU20.1@1062.279,1667.221 v1(1062.87,1667.812) ; RU20.1@1062.365,1667.408 ccw(c1062.365,1667.652) RU20.1@1062.538,1667.48 ; RU20.1@1062.551,1667.083 cw(c1062.993,1667.26) v1@1062.656,1667.598 ; RU20.1@1062.736,1667.157 cw(c1063.299,1667.383) v1(1062.87,1667.812) ; J1.229@1143.715,1627.195 J1.229@1143.734,1627.175 ; v1@1159.75,1623.25 v1@1160,1623.5
  TopLayer w0.3: HDMI.18@1049.3,1654.7 1050.9,1654.7 ; v1(1062.87,1667.812) UU1.20@1062.87,1669.904
  TopLayer w0.35: J4.33@1156.5,1622.25 1157.5,1623.25 v1@1159.75,1623.25 ; J4.33@1156.5,1622.76 ccw(c1156.5,1623.991) 1157.371,1623.121 ; J4.33@1156.96,1622.3 cw(c1157.95,1622.3) 1157.25,1623
  TopLayer w0.4: J1.230@1138.515,1627.195 J1.229@1143.715,1627.195 ; J1.229@1143.734,1627.175 1146.683,1627.099 1147.058,1626.724
  TopLayer w0.5: 1050.9,1654.7 CU7.1@1053.8,1654.7 ; v1@1052.803,1654.7 ccw(c1052.803,1655.644) CU7.1@1053.471,1654.976 ; v1@1052.943,1654.7 cw(c1052.943,1653.954) CU7.1@1053.471,1654.481 ; v1@1062.933,1667.812 CU4.1@1063.626,1667.12 ; v1@1063.202,1667.544 ccw(c1063.798,1668.14) CU4.1@1063.798,1667.297 ; L506.2@1121.078,1666.976 v1@1122.376,1666.976 ; L506.2@1121.305,1666.799 cw(c1121.731,1666.372) 1121.731,1666.976 cw(c1121.731,1667.58) L506.2@1121.305,1667.153 ; CV1.1@1128.51,1576.81 1128.51,1575.74 1129.8,1574.45 CAMERA_B.17@1129.8,1573.2 ; v1(1135,1626.5) 1135.684,1627.184 J1.230@1138.525,1627.184 ; UART2.1@1161.26,1680.749 ccw(c1160.663,1681.347) 1161.508,1681.347 ccw(c1162.353,1681.347) UART2.1@1161.755,1680.749 ; C107.1@1161.283,1684.113 cw(c1160.742,1683.572) 1161.508,1683.572 ; C107.1@1161.5,1684.2 1161.508,1684.192 UART2.1@1161.508,1679.902 ; v2@1186.191,1570.841 LED2.1@1193.3,1570.89 ; 1186.959,1570.847 ccw(c1186.952,1571.922) LED1.1@1187.717,1571.167 ; 1187.165,1570.848 cw(c1187.171,1570.064) LED1.1@1187.721,1570.622 ; LED1.1@1188.262,1571.171 ccw(c1189.017,1571.936) 1189.024,1570.861 ; LED1.1@1188.266,1570.626 cw(c1188.823,1570.076) 1188.818,1570.859 ; 1192.213,1570.883 cw(c1192.221,1569.731) LED2.1@1193.03,1570.551 ; 1192.527,1570.885 ccw(c1192.522,1571.592) LED2.1@1193.026,1571.095
  TopLayer w0.8: 1147.115,1626.616 1149.045,1626.616 1150.461,1625.2 1152.2,1625.2 1155.1,1622.3 J4.33@1156.5,1622.3 ; 1148.413,1626.616 cw(c1148.413,1625.649) C21.1@1149.097,1626.333 ; C21.1@1149.263,1626.01 cw(c1149.263,1625.073) 1149.926,1625.735 ; C21.1@1149.612,1626.049 ccw(c1151.3,1627.737) CMB2.1@1151.3,1625.35 ; CMB2.1@1151.3,1625.05 cw(c1151.3,1622.515) 1153.092,1624.308 ; CMB2.1@1151.33,1625.055 cw(c1151.731,1623.781) 1152.675,1624.725
  TopLayer w1: FUSE2.2@1049.5,1678.509 cw(c1049.5,1676.911) 1050.63,1678.041 ; FUSE2.2@1049.6,1679.071 1051.2,1677.471 ; C105.1@1050.44,1676.31 ccw(c1049.933,1677.471) 1051.2,1677.471 ; v1(1051.2,1676.2) 1051.2,1677.471 ; FUSE3.2@1077.9,1678.3 1079.5,1676.7 MIPI.2@1079.5,1672.6 ; FUSE3.2@1078.172,1678.976 ccw(c1080.461,1678.976) 1078.842,1677.358 ; 1078.754,1677.446 cw(c1077.14,1675.832) CU6.1@1079.422,1675.832 ; 1079.077,1677.123 cw(c1078.139,1676.184) CU6.1@1079.425,1675.857 ; CM4.1@1099.1,1582.8 v1(1100,1582.8) 1101.115,1582.801 LCD40P.1@1107.498,1582.802 ; v1(1159.824,1623.324) 1164.9,1628.4 1164.9,1637.1 1170.4,1642.6 1183.8,1642.6 1187.1,1645.9 ; UART3.1@1177.6,1679.9 1177.6,1681.8 1179.1,1683.3 1193.5,1683.3 1195,1681.8 1195,1666.1 1197.901,1663.199 ; 1184.539,1643.339 ccw(c1182.923,1644.955) UT3.3@1185.13,1645.548
  TopLayer w2: UT3.3@1185.6,1645.9 1187.3,1645.9 1189.5,1648.1 1189.5,1654.4 1198.1,1663 S1.2@1214.2,1663 ; 1193.126,1658.026 cw(c1195.23,1655.922) 1195.23,1658.898
  BottomLayer w0.2: J4.33@1156.5,1622.25 J4.33@1156.75,1622.25
  BottomLayer w0.35: J4.33@1156.75,1622.25 1157.75,1623.25 v1@1160,1623.25
  BottomLayer w0.4: CAMERA_B.17@1129.8,1572.8 cw(c1129.8,1571.834) 1130.483,1572.517 cw(c1131.166,1573.2) CAMERA_B.17@1130.2,1573.2 ; CAMERA_B.17@1129.8,1573.2 1130.8,1572.2 1130.8,1569.7
  BottomLayer w0.5: 1057.9,1672.782 1057.941,1672.741 v1(1062.87,1667.812) ; 1100,1578.6 1100.8,1577.8 CAMERA_A1.17@1100.8,1573.2 ; CAMERA_A1.17@1100.553,1573.447 ccw(c1099.955,1574.045) 1100.8,1574.045 ccw(c1101.645,1574.045) CAMERA_A1.17@1101.047,1573.447 ; v1(1122.3,1666.976) 1123.624,1668.3 1127.9,1668.3 1129.1,1669.5 1129.1,1678.3 ; v1(1135,1626.5) 1141.1,1620.4 1151.8,1620.4 1153.2,1621.8 1155.3,1621.8 1155.8,1622.3 ; 1155.45,1621.95 cw(c1155.883,1621.517) J4.33@1156.262,1621.998 ; 1155.632,1622.132 cw(c1156.347,1621.417) J4.33@1156.52,1622.413 ; 1155.848,1622.348 cw(c1156.233,1621.962) J4.33@1156.571,1622.39 ; J4.33@1156.175,1622.094 ccw(c1155.8,1621.856) 1155.8,1622.3 ; J4.33@1156.175,1622.506 cw(c1155.8,1622.744) 1155.8,1622.3 ; J4.33@1156.5,1622.3 1155.8,1622.3
  BottomLayer w1: 1047.922,1594.522 cw(c1049.8,1592.644) CAMERA_A2.17@1049.8,1595.3 ; 1048.3,1594.9 cw(c1049.391,1593.809) CAMERA_A2.17@1049.775,1595.303 ; CAMERA_A2.17@1049.8,1595.4 1048.8,1595.4 1047.8,1594.4 1047.8,1578.2 1056.3,1569.7 1184.9,1569.7 1186.465,1571.265 1220.3,1605.1 1220.3,1659.6 1217.104,1662.796 S1.2@1214.008,1662.796 ; v1(1051.2,1676.2) 1051.2,1674.2 1055.4,1670 ; v1(1052.5,1654.7) 1055.3,1657.5 1055.3,1670.1 1057.941,1672.741 1063.5,1678.3 1079.2,1678.3 1081.5,1676 ; MIPI.2@1079.5,1672.6 1079.5,1674 1081.5,1676 ; 1092.2,1569.7 J3.1@1092.2,1570.9 ; J3.1@1092.2,1571.6 ccw(c1092.2,1573.531) 1093.566,1572.166 ; J3.1@1092.3,1570.9 1100,1578.6 v1(1100,1582.8) ; UART1.1@1149.6,1679.9 1149.6,1682.6 ; UART2.1@1161.508,1679.902 1161.508,1682.492 ; UART3.1@1177.6,1680.1 1177.6,1681.7 1176.6,1682.7 1133.5,1682.7 1129.1,1678.3 1102.7,1678.3 1100.4,1676 1081.5,1676 ; S1.2@1214.861,1662.442 cw(c1215.715,1661.589) 1215.715,1662.796 cw(c1215.715,1664.003) S1.2@1214.861,1663.149
  other v2: 1186.091,1570.841
VDD_BATT: J1.233 R71.2 | length 34.8
  TopLayer w0.2: J1.233@1143.715,1625.595 1145.305,1625.595 ; J1.233@1144.835,1625.524 cw(c1145.006,1625.353) 1145.006,1625.595 ; J1.233@1144.835,1625.665 ccw(c1145.006,1625.836) 1145.006,1625.595
  TopLayer w0.4: J1.233@1143.715,1625.595 1145.205,1625.595 ; 1145.305,1625.595 1146,1624.9 1146,1623.4 1147.2,1622.2 1151.75,1622.2 1153.225,1620.725 1154.65,1619.3 1161.75,1619.3 1165.2,1622.75 R71.2@1170.6,1622.75 ; R71.2@1170.388,1622.538 ccw(c1169.876,1622.026) 1169.876,1622.75 ccw(c1169.876,1623.474) R71.2@1170.388,1622.962
VDEN: J1.75 R107.3 | length 49.5
  TopLayer w0.135: J1.75@1085.2,1636.8 1087.584,1636.8 1087.985,1636.399 1091.999,1636.399 ; J1.75@1086.344,1636.706 cw(c1086.57,1636.48) 1086.57,1636.8 cw(c1086.57,1637.12) J1.75@1086.344,1636.894
  TopLayer w0.2: 1092,1636.4 1097.33,1636.4 ; 1097.33,1636.395 1120.029,1613.697 1122.2,1613.697 1122.633,1613.264 R107.3@1122.633,1612 ; R107.3@1122.527,1612.456 ccw(c1122.271,1612.712) 1122.633,1612.712 ccw(c1122.995,1612.712) R107.3@1122.739,1612.456
VSYNC: J1.76 R107.2 | length 44.6
  TopLayer w0.2: J1.76@1090.398,1636.795 1097.496,1636.795 1120.194,1614.097 1122.503,1614.097 1123.522,1613.078 R107.2@1123.522,1612 ; R107.2@1123.416,1612.456 ccw(c1123.16,1612.712) 1123.522,1612.712 ccw(c1123.884,1612.712) R107.2@1123.628,1612.456
VSYNC_LDI: J1.83
WARM_RST: J1.137
WIFI_IO: RW18.1 WIFI2.15 | length 13.1
  TopLayer w0.2: RW18.1@1212.279,1645.805 1216.195,1645.805 1218.512,1643.488 WIFI2.15@1218.512,1642.088 ; RW18.1@1212.611,1645.522 cw(c1213.294,1644.839) 1213.294,1645.805 cw(c1213.294,1646.771) RW18.1@1212.611,1646.088 ; WIFI2.15@1218.158,1642.442 ccw(c1217.305,1643.295) 1218.512,1643.295 ccw(c1219.719,1643.295) WIFI2.15@1218.865,1642.442 ; WIFI2.15@1218.299,1642.3 ccw(c1217.787,1642.812) 1218.512,1642.812 ccw(c1219.236,1642.812) WIFI2.15@1218.724,1642.3
WIFI_PD: RW17.1 WIFI2.13 | length 20.7
  TopLayer w0.2: RW17.1@1208.579,1646.105 1209.174,1646.7 ; RW17.1@1208.654,1646.504 ccw(c1208.697,1647.176) 1209.174,1646.7 ; RW17.1@1209.02,1646.186 cw(c1209.572,1646.301) 1209.174,1646.7 ; WIFI2.13@1218.512,1640.088 1219.6,1641.176 1219.6,1643.7 1216.6,1646.7 1209.174,1646.7 ; WIFI2.13@1218.512,1640.388 ccw(c1218.512,1641.112) 1219.024,1640.6 ccw(c1219.536,1640.088) WIFI2.13@1218.812,1640.088 ; WIFI2.13@1218.512,1640.588 ccw(c1218.512,1641.795) 1219.365,1640.942 ccw(c1220.219,1640.088) WIFI2.13@1219.012,1640.088
WIFI_PWR: CW1.1 QW1.1 RW19.2 RW20.2 | length 14.1
  TopLayer w0.2: CW1.1@1201.605,1623.985 1203.192,1623.985 1203.271,1623.905 RW19.2@1203.271,1622.295 1204.919,1622.295 RW20.2@1204.929,1622.305 ; CW1.1@1201.888,1623.702 cw(c1202.571,1623.019) 1202.571,1623.985 cw(c1202.571,1624.95) CW1.1@1201.888,1624.267 ; 1202.448,1623.985 cw(c1202.448,1623.212) QW1.1@1202.994,1623.758 ; 1202.516,1623.985 ccw(c1202.516,1624.66) QW1.1@1202.994,1624.183 ; RW19.2@1202.989,1622.578 ccw(c1202.306,1623.261) 1203.271,1623.261 ccw(c1204.237,1623.261) RW19.2@1203.554,1622.578 ; QW1.1@1202.994,1623.558 cw(c1202.325,1622.889) 1203.271,1622.889 ; QW1.1@1203.136,1623.7 cw(c1202.807,1623.372) QW1.1@1203.271,1623.372 ; 1203.271,1623.204 cw(c1203.773,1623.204) QW1.1@1203.418,1623.558 ; RW19.2@1203.604,1622.012 cw(c1204.287,1621.329) 1204.287,1622.295 cw(c1204.287,1623.261) RW19.2@1203.604,1622.578 ; 1203.889,1622.295 ccw(c1203.889,1623.295) RW20.2@1204.596,1622.588 ; 1203.937,1622.295 cw(c1203.937,1621.363) RW20.2@1204.596,1622.022 ; 1204.372,1622.295 ccw(c1204.372,1622.812) RW20.2@1204.737,1622.446
XCLKOUT: J1.110
XEINT0: J1.1 J4.39 KEY1.1 R1.1 | length 144.5
  TopLayer w0.2: KEY1.1@1057.3,1579.6 1060.1,1582.4 ; KEY1.1@1057.566,1579.798 cw(c1057.681,1579.816) KEY1.1@1057.598,1579.898 ; KEY1.1@1057.763,1579.829 cw(c1058.161,1579.892) KEY1.1@1057.876,1580.176 ; KEY1.1@1057.961,1579.86 cw(c1058.641,1579.967) KEY1.1@1058.154,1580.454 ; KEY1.1@1058.158,1579.891 cw(c1059.122,1580.043) 1058.432,1580.732 ; KEY1.1@1058.356,1579.922 cw(c1059.602,1580.118) 1058.71,1581.01 ; KEY1.1@1058.554,1579.953 cw(c1060.083,1580.194) 1058.988,1581.288 ; KEY1.1@1058.751,1579.984 cw(c1060.563,1580.269) 1059.266,1581.566 ; KEY1.1@1058.949,1580.016 cw(c1061.043,1580.345) 1059.544,1581.844 ; KEY1.1@1059.146,1580.047 cw(c1061.524,1580.42) 1059.822,1582.122 ; KEY1.1@1059.344,1580.078 cw(c1062.004,1580.496) 1060.1,1582.4 ; R1.1@1061.717,1581.583 ccw(c1061.034,1582.266) 1062,1582.266 ccw(c1062.966,1582.266) R1.1@1062.283,1581.583 ; R1.1@1062,1581.3 1062,1582.4 ; 1083.883,1607.19 ccw(c1083.883,1607.467) J1.1@1084.079,1607.271 ; 1083.934,1607.19 cw(c1083.934,1606.984) J1.1@1084.079,1607.129 ; J1.1@1086.321,1607.129 cw(c1086.466,1606.984) 1086.466,1607.19 ; J1.1@1086.321,1607.271 ccw(c1086.517,1607.467) 1086.517,1607.19 ; v2(1087.5,1606.6) 1086.91,1607.19 1082.94,1607.19 1080.3,1604.55 1080.3,1587.963 1074.737,1582.4 1060.1,1582.4
  BottomLayer w0.2: v2(1087.5,1606.6) 1093.957,1606.6 1102.357,1615 1122.2,1615 1122.9,1615.7 1154.35,1615.7 1154.9,1616.25 J4.39@1156.5,1616.25 ; 1155.088,1616.25 ccw(c1155.088,1617.712) J4.39@1156.122,1616.678 ; 1155.329,1616.25 cw(c1155.329,1615.129) J4.39@1156.122,1615.922 ; 1155.571,1616.25 ccw(c1155.571,1617.229) J4.39@1156.263,1616.537 ; 1155.812,1616.25 cw(c1155.812,1615.612) J4.39@1156.263,1616.063
XEINT1: J1.2 J4.40 KEY2.1 R2.1 | length 142.9
  TopLayer w0.2: KEY2.1@1058.2,1571.9 1059.9,1571.9 ; KEY2.1@1059.083,1571.711 cw(c1059.48,1571.389) 1059.48,1571.9 cw(c1059.48,1572.411) KEY2.1@1059.083,1572.089 ; KEY2.1@1059.238,1571.585 cw(c1059.9,1571.048) 1059.9,1571.9 ; KEY2.1@1059.238,1572.215 ccw(c1059.9,1572.752) 1059.9,1571.9 ; 1059.982,1571.982 cw(c1060.75,1571.214) R2.1@1060.75,1572.3 ; 1060.103,1572.103 ccw(c1059.505,1572.7) R2.1@1060.35,1572.7 ; R2.1@1060.323,1572.323 cw(c1060.75,1571.896) R2.1@1060.75,1572.5 ; R2.1@1060.85,1573.1 ccw(c1060.85,1573.704) 1061.277,1573.277 ; R2.1@1061.05,1572.7 cw(c1061.895,1572.7) 1061.297,1573.297 ; R2.1@1061.25,1572.7 cw(c1062.578,1572.7) 1061.639,1573.639 ; 1089.073,1606.773 ccw(c1088.646,1607.2) J1.2@1089.25,1607.2 ; J1.2@1090.41,1607.19 1089.49,1607.19 v2(1088.2,1605.9) 1087.2,1605.9 1086.5,1606.6 1083.85,1606.6 1080.7,1603.45 1080.7,1587.797 1074.903,1582 1067.5,1582 1065.6,1580.1 1065.6,1577.6 1060.75,1572.75 1059.9,1571.9
  BottomLayer w0.2: v2(1088.2,1605.9) 1093.822,1605.9 1102.522,1614.6 1122.4,1614.6 1123.1,1615.3 1157.55,1615.3 J4.40@1158.5,1616.25 ; 1157.575,1615.325 ccw(c1156.633,1616.267) J4.40@1157.965,1616.291 ; 1157.672,1615.422 cw(c1158.5,1614.594) J4.40@1158.5,1615.765 ; 1157.908,1615.658 ccw(c1157.288,1616.279) J4.40@1158.165,1616.294 ; 1158.013,1615.763 cw(c1158.5,1615.277) J4.40@1158.5,1615.965
XEINT2: J1.3 J4.37 KEY3.1 R3.1 | length 142.4
  TopLayer w0.2: KEY3.1@1049.5,1575.9 1051.1,1575.9 ; KEY3.1@1050.562,1575.617 cw(c1051.1,1575.248) 1051.1,1575.9 ; KEY3.1@1050.562,1576.183 ccw(c1051.1,1576.552) 1051.1,1575.9 ; R3.1@1063.417,1583.717 cw(c1062.734,1583.034) 1063.7,1583.034 cw(c1064.666,1583.034) R3.1@1063.983,1583.717 ; 1063.7,1582.8 R3.1@1063.7,1584 ; 1083.883,1607.99 ccw(c1083.883,1608.267) J1.3@1084.079,1608.071 ; 1083.934,1607.99 cw(c1083.934,1607.784) J1.3@1084.079,1607.929 ; J1.3@1086.321,1607.929 cw(c1086.466,1607.784) 1086.466,1607.99 ; J1.3@1086.321,1608.071 ccw(c1086.517,1608.267) 1086.517,1607.99 ; v2@1087.49,1607.99 1082.99,1607.99 1079.9,1604.9 1079.9,1588.128 1074.572,1582.8 1058,1582.8 1051.1,1575.9
  BottomLayer w0.2: v2(1087.5,1608) 1094.225,1608 1102.025,1615.8 1121.6,1615.8 1122.4,1616.6 1153.45,1616.6 1155.1,1618.25 ; 1155.329,1618.25 cw(c1155.329,1617.129) J4.37@1156.122,1617.922 ; 1155.579,1618.25 ccw(c1155.579,1619.21) J4.37@1156.262,1618.535 ; 1155.812,1618.25 cw(c1155.812,1617.612) J4.37@1156.263,1618.063 ; J4.37@1156.119,1618.676 cw(c1155.1,1619.683) 1155.1,1618.25 ; J4.37@1156.5,1618.25 1155.1,1618.25
XEINT3: J1.4 J4.38 KEY4.1 R4.1 | length 140.1
  TopLayer w0.2: R4.1@1065.567,1572.983 ccw(c1064.522,1574.028) 1066,1574.028 ; R4.1@1065.709,1572.841 ccw(c1065.005,1573.545) 1066,1573.545 ; KEY4.1@1065.796,1575.546 cw(c1065.305,1575.055) 1066,1575.055 ; KEY4.1@1065.796,1576.254 ccw(c1065.305,1576.745) 1066,1576.745 ; R4.1@1066,1572.7 1066,1579.934 1067.666,1581.6 1075.069,1581.6 1081.1,1587.631 1081.1,1602.75 1084.25,1605.9 v2(1086.2,1605.9) ; 1066,1573.304 ccw(c1066.454,1573.304) R4.1@1066.133,1572.983 ; 1066,1574.331 cw(c1067.719,1574.331) KEY4.1@1066.504,1575.546 ; 1066,1574.814 cw(c1067.236,1574.814) KEY4.1@1066.362,1575.688 ; 1066,1575.296 cw(c1066.754,1575.296) KEY4.1@1066.221,1575.829 ; 1066,1576.504 ccw(c1066.754,1576.504) KEY4.1@1066.221,1575.971 ; 1066,1576.986 ccw(c1067.236,1576.986) KEY4.1@1066.362,1576.112 ; 1066,1577.469 ccw(c1067.719,1577.469) KEY4.1@1066.504,1576.254 ; v2(1088.2,1607.3) 1088.89,1607.99 J1.4@1090.41,1607.99 ; 1089.083,1607.99 ccw(c1089.083,1608.267) J1.4@1089.279,1608.071 ; 1089.134,1607.99 cw(c1089.134,1607.784) J1.4@1089.279,1607.929
  BottomLayer w0.2: v2(1086.2,1605.9) 1086.2,1606.6 1086.9,1607.3 1094.091,1607.3 1102.191,1615.4 1121.9,1615.4 1122.6,1616.1 1153.9,1616.1 1155.1,1617.3 1157.55,1617.3 ; 1157.565,1617.315 J4.38@1158.5,1618.25 ; 1157.59,1617.34 ccw(c1156.683,1618.247) J4.38@1157.965,1618.284 ; 1157.672,1617.422 cw(c1158.5,1616.594) J4.38@1158.5,1617.765 ; 1157.918,1617.668 ccw(c1157.32,1618.266) J4.38@1158.165,1618.29 ; 1158.013,1617.763 cw(c1158.5,1617.277) J4.38@1158.5,1617.965